# Altium PCB ActuatorMKII.PcbDoc (part 3 of 3)
Units mil, origin at the board's own origin, x right, y up, seen from the top; angles counter-clockwise.
Board outline 7000 x 5000 mil, 4 copper layers (Top Layer, Middle 1 Layer, Middle 2 Layer, Bottom Layer), stack 53.912 mil thick; 139 components, 107 nets, 485 pads, 302 vias.
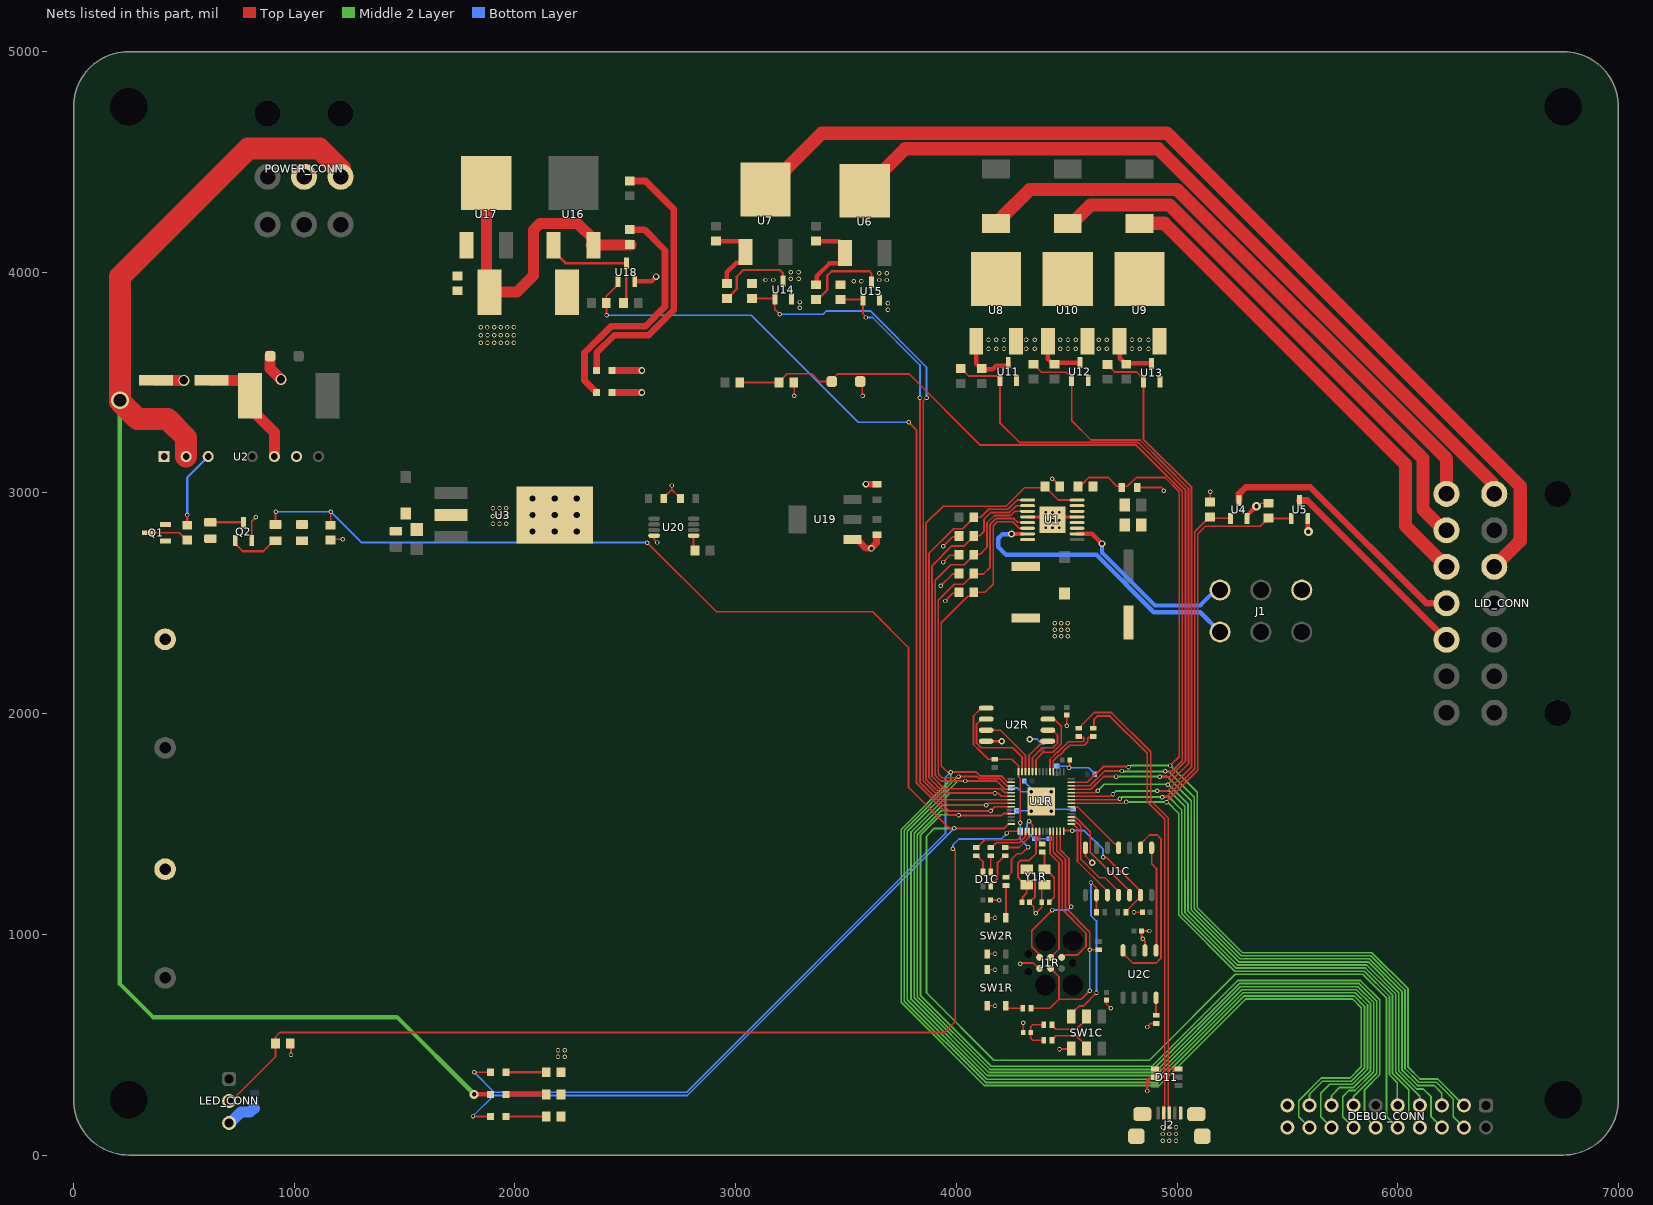
[diagram p4: the nets of this part, all layers, seen from the top]

## Via types
v1: diameter 20, hole 12, Top Layer to Bottom Layer, tented both sides, 244 vias
v2: diameter 50, hole 28, Top Layer to Bottom Layer, tented both sides, 22 vias
v3: diameter 30, hole 18, Top Layer to Bottom Layer, tented both sides, 13 vias
v4: diameter 30, hole 16, Top Layer to Bottom Layer, tented both sides, 10 vias
v5: diameter 40, hole 25, Top Layer to Bottom Layer, tented both sides, 4 vias
v6: diameter 40, hole 20, Top Layer to Bottom Layer, tented both sides, 3 vias
v7: diameter 50, hole 38, Top Layer to Bottom Layer, tented both sides, 3 vias
v8: diameter 40, hole 28, Top Layer to Bottom Layer, tented both sides, 2 vias
v9: diameter 80, hole 58, Top Layer to Bottom Layer, tented both sides, 1 vias

## Nets (pads, with @x,y where several pads share a name; then routed paths per layer and width w, separated by ;. In a path a pad name is that pad's centre, name@x,y a point inside that pad or via, vN(x,y) a via of type N, cw(c..) or ccw(c..) an arc to the next point about the centre after c; other vN are vias at no path point) (continued)
CANRX_RP2CAN: U1C.2 U2C.4 | length 886.3
  Top Layer w8: U2C.4@4755,927.28 4755,914.78 4799.78,870 4905,870 4926.81,891.81 4926.81,1433.19 4910,1450 4875,1450 4835,1410 U1C.2@4835,1392.28
CANTX_RP2CAN: U1C.1 U2C.1 | length 474.9
  Top Layer w8: U1C.1@4885,1392.28 4885,1320 4907,1298 4907,929.28 U2C.1@4905,927.28
COIL_1: D5.1 LID_CONN.8 U8.3 | length 2779.8
  Top Layer w60: D5.1@4180,4222 4200,4222 4213,4235 4213,4255 4333,4375 5000,4375 6221.06,3153.94 LID_CONN.8@6221.06,2996.06
COIL_2: D6.1 LID_CONN.9 U10.3 | length 2495.8
  Top Layer w60: D6.1@4505,4222 4518,4235 4538,4235 4608,4305 4965,4305 6115,3155 6115,2925 6209.29,2830.71 LID_CONN.9@6221.06,2830.71
COIL_3: D7.1 LID_CONN.10 U9.3 | length 2199
  Top Layer w60: D7.1@4830,4222 4830.14,4221.86 4943.14,4221.86 6035,3130 6035,2851.42 6220,2666.42 LID_CONN.10@6220,2665
DBG_TX_RP2040: J1R.5 U1R.27 | length 721.1
  Top Layer w8: J1R.5@4377.13,895.5 4372.73,899.9 4372.73,912.27 4341.63,943.37 4341.63,1016.63 v1(4435,1110) ; U1R.27@4471.11,1466.79 4471.11,1382.79 4510,1343.91 4510,1135.69 4520,1125.69 v1(4520,1125)
  Bottom Layer w8: v1(4435,1110) 4503.89,1110 4518.89,1125 v1(4520,1125)
DRAIN: DEBUG_CONN.12 R29.2 U1R.11 U18.1 | length 7861.7
  Top Layer w8: v1(2415,3805) 2415,3858.5 R29.2@2413.5,3860 2413.5,3891 2467.5,3945 U18.1@2467.5,3959 ; v1(3785,3320) 3820,3285 3820,1685.2 3963.7,1541.5 4008.5,1541.5 4011.5,1538.5 4205.28,1538.5 4213.79,1547.01 U1R.11@4249.17,1547.01
  Middle 2 Layer w8: v1(4010,1540) 4008,1542 3929.47,1542 3837,1449.53 3837,723.4 4158.4,402 4886.6,402 5275.6,791 5830.81,791 5919,702.81 5919,365.05 5850,296.05 5850,175 DEBUG_CONN.12@5895,130
  Bottom Layer w8: v1(2415,3805) 3070,3805 3555,3320 v1(3785,3320)
DROPPER_1: LID_CONN.11 U4.3 | length 1201
  Top Layer w30: U4.3@5280,2965.73 5281,2966.73 5281,2996 5311,3026 5604,3026 6130,2500 LID_CONN.11@6221.06,2500
DROPPER_2: LID_CONN.12 U5.3 | length 927.6
  Top Layer w30: U5.3@5555,2966 5589.71,2966 LID_CONN.12@6221.06,2334.65
GND: C1.2 C1C.2 C1R.2 C2C.1 C2R.2 C3.2 C3C.2 C3R.2 C4.2 C4C.2 C4R.2 C5.2 C5C.2 C5R.2 C6R.2 C7.2 C7R.2 C8.2 C8R.2 C9.2 C9R.2 C10.2 C10R.2 C11.2 C11R.2 C12.2 C12R.2 C13.2 C13R.2 C14.2 C15.2 D1.1 D8.2 D9.1 D10.2 D11.2 DEBUG_CONN.19 DEBUG_CONN.20 J1.6 J1R.6 J2.5 J2.6 J2.7 J2.8 J2.9 LED_CONN.3 POWER_CONN.2 Q2.2 R6.1 R6C.2 R7.2 R8.2 R9.2 R10.2 R21.2 R22.2 R23.2 R31.1 R32.1 R33.1 R34.1 R35.1 R36.1 R37.1 R38.1 R39.1 R40.1 R41.1 SW1C.6 SW1R.B1 SW1R.B2 SW2R.B1 SW2R.B2 U1.4 U1.13 U1.17 U1C.7 U1R.19 U1R.57 U2.1 U2.7 U2C.2 U2R.4 U3.2 U3.4 U4.2 U5.2 U8.2 U9.2 U10.2 U11.2 U12.2 U13.2 U14.2 U15.2 U18.2 U19.1 U20.4 Y1R.2 Y1R.4 | length 4677.7
  Top Layer w8: Q2.2@807.5,2784 807.5,2872.5 v1@825,2890 ; R41.1@982,505 985,502 v1(985,455) ; R38.1@1165,2786.5 1168.5,2790 v1(1220,2790) ; U20.4@2630.43,2806.61 2630,2806.18 2630,2790 v1@2645,2775 ; C14.2@2675,2960 C14.2@2675,2965 ; C14.2@2675,2975 2675,2980 2710,3015 ; v1(2710,3034) 2710,3015 ; C15.2@2744,2978.3 2744,2986 2739,2991 2734,2991 2710,3015 ; R22.2@3263.5,3500 3265,3498.5 v1(3265,3440) ; D9.1@3564.37,3505 3573.62,3495.75 3573.62,3441.38 v1(3575,3440) ; v1(3930,2579) 3930,2580 3982.5,2632.5 4009,2632.5 R35.1@4011.5,2635 ; v1(3940.65,2686.89) 3971.26,2717.5 4009,2717.5 R33.1@4011.5,2720 ; v1@3944.79,2760.21 3944.79,2762.67 3984.19,2802.07 4008.57,2802.07 R39.1@4011.5,2805 ; v1@3950,2510 3950,2511.2 3984.19,2545.39 4006.89,2545.39 R34.1@4011.5,2550 ; SW1R.B1@4135,835.71 SW1R.B1@4137.68,838.39 ; SW1R.B2@4140,676.61 SW1R.B2@4141.61,675 ; SW1R.B1@4140,840 v1(4175,840) ; SW2R.B2@4140,911.61 v1(4175,911.61) ; SW2R.B1@4140,1075 v1@4180,1075 ; SW1R.B2@4141.61,676.61 v1(4175,676.61) ; v1(4289.13,866.73) 4292.9,870.5 4347.16,870.5 4372.16,845.5 J1R.6@4377.13,845.5 ; v1@4300,600 v1@4301.44,598.56 ; C2C.1@4301.44,556.44 C2C.1@4302.87,555 ; C2C.1@4302.87,556.44 v1@4302.87,598.56 ; Y1R.4@4319.11,1295 4325.01,1295 4356.67,1263.35 4356.67,1171.22 4331.23,1145.79 C1R.2@4331.23,1145 4331.23,1144.21 4351.07,1124.37 4351.07,1103.04 v1(4359.11,1095) 4386.98,1122.87 C2R.2@4386.98,1145 4386.98,1212.87 Y1R.2@4399.11,1225 ; v1(4330.92,1513.23) 4330.92,1510.55 4345.13,1496.33 U1R.19@4345.13,1466.79 ; U1R.57@4357.87,1602.13 U1R.57@4384.5,1602.13 U1R.57@4407.33,1579.3 ; v1(4435,3065) 4436,3065 4468.5,3032.5 R40.1@4468.5,3030 ; v1(4467.42,480) 4518.94,480 SW1C.6@4521.1,482.17 ; v1(4500,1945) C3R.2@4500,1990.88 ; v1(4510.8,1755) 4512.45,1756.65 4512.45,1788.35 C4R.2@4514.11,1790 ; U1C.7@4585,1392.28 4585,1355 v4(4615,1325) ; C3C.2@4680,702.87 4680.46,702.41 4680.46,684.54 v1(4700,665) ; v1(4805,1100) C1C.2@4842.87,1100 ; C3.2@4820,3025 4930.51,3025 4937.7,3017.81 4937.7,3012.3 v1(4940,3010) ; C4C.2@4839.25,1015 4839.25,985.75 4855,970 U2C.2@4855,927.28 ; C4C.2@4840,1015 v1(4875,1015) ; v1(4865,580) 4881.3,596.3 R6C.2@4905,596.3 ; R31.1@5150,2958.5 v1(5150,3005) ; v6(5360,2940) 5367,2940 5380.5,2953.5 R32.1@5415,2953.5
  Top Layer w10: U2R.4@4135.24,1875.14 4135.3,1875.07 4204.93,1875.07 v4(4205,1875) ; C5C.2@4154.83,1155 v1(4195,1155)
  Top Layer w12: v1(4865,290) 4865,335 4876.59,346.59 4894.19,346.59 D11.2@4900,352.4
  Top Layer w14: U1.4@4322.8,2891.3 4388.74,2891.3 4402.94,2905.5 4404.5,2905.5 U1.17@4405,2905
  Top Layer w15: U1.17@4465,2905 4465.5,2905.5 4467.06,2905.5 4481.26,2891.3 U1.13@4547.2,2891.3
  Top Layer w20: U18.2@2542.5,3959 2619,3959 v3(2640,3980) ; U4.2@5317.5,2884 5317.5,2898 5359.5,2940 v6(5360,2940) ; U5.2@5592.5,2884 5592.5,2827.5 v6(5595,2825)
  Top Layer w30: D10.2@2440,3455 v3(2575,3455) ; D8.2@2440,3555 v3(2575,3555) ; U19.1@3530,2789.45 3534.69,2784.76 3555.35,2784.76 3591.12,2749 v3(3615,2749) ; v3(3590,3040) C12.2@3640,3040 ; v3@3615,2750 3638.18,2773.18 3638.18,2810 C13.2@3640,2810
  Top Layer w50: C7.2@374,3510 v7@490,3510 ; D1.1@890.63,3620 890.63,3564.37 v7(940,3515)
  Bottom Layer w8: C7R.2@4245,1662.87 4277.13,1662.87 4293.37,1646.63 v4(4340,1646.63) 4335.79,1650.84 4335.79,1664.36 4314.9,1685.25 4314.9,1687.98 C13R.2@4307.87,1695 ; C6R.2@4272.13,1560 4335,1560 v4@4340,1555 ; v1(4330.92,1513.23) 4320,1502.31 4320,1465.15 4339.05,1446.1 4345.25,1439.9 4347.98,1439.9 C8R.2@4355,1432.87 C12R.2@4420,1432.87 ; v4@4335,1885 4365.31,1885 4378.19,1872.13 C5R.2@4390,1872.13 ; v4(4429,1557.63) 4434.95,1557.63 4444.45,1567.13 C9R.2@4530,1567.13 ; C11R.2@4455,1762.13 4500.43,1762.13 4507.55,1755 4599.85,1755 4620.1,1734.75 4620.1,1732.02 C10R.2@4627.13,1725
  Bottom Layer w50: LED_CONN.3@705,145 708.73,145 758.73,195 800,195 815,210 C1.2@820,210
  other v1: 4935.36,65.36 4965.36,65.36 4995.36,65.36 4935.36,95.36 4965.36,95.36 4995.36,95.36 4935.36,125.36 4965.36,125.36 4995.36,125.36 2195,445 2225,445 2195,475 2225,475 4302.87,600 4845,980 4175,1075 4445.36,2350.36 4475.36,2350.36 4505.36,2350.36 4445.36,2380.36 4475.36,2380.36 4505.36,2380.36 4445.36,2410.36 4475.36,2410.36 4505.36,2410.36 3949.21,2510.41 3940.87,2758.75 2645.36,2775.36 4405.81,2842.12 4435.81,2842.12 4465.81,2842.12 1900.36,2860.36 1930,2860 1960,2860 4405.81,2877.12 4435.81,2877.12 4465.81,2877.12 825.36,2890.36 1900,2895 1930,2895 1960,2895 4405.81,2912.12 4435.46,2911.77 4465.81,2912.12 1900.36,2930.36 1930,2930 1960,2930 4145.87,3653.75 4180.87,3653.75 4215.87,3653.75 4315.87,3653.75 4355.87,3653.75 4470.87,3653.75 4505.87,3653.75 4540.87,3653.75 4645.87,3653.75 4680.87,3653.75 4795.87,3653.75 4830.87,3653.75 4870.87,3653.75 1845.36,3680.36 1875.36,3680.36 1905.36,3680.36 1935.36,3680.36 1965.36,3680.36 1995.36,3680.36 4145.87,3693.75 4180.87,3693.75 4215.87,3693.75 4315.87,3693.75 4355.87,3693.75 4470.87,3693.75 4505.87,3693.75 4540.87,3693.75 4645.87,3693.75 4680.87,3693.75 4795.87,3693.75 4830.87,3693.75 4870.87,3693.75 1845.36,3715.36 1875.36,3715.36 1905.36,3715.36 1935.36,3715.36 1965.36,3715.36 1995.36,3715.36 1845.36,3750.36 1875,3750 1905.36,3750.36 1935.36,3750.36 1965,3750 1995.36,3750.36 3690,3830 3290,3840 3690,3860 3290,3865 3535,3960 3570,3960 3135,3965 3170,3965 3650,3965 3685,3965 3250,3970 3285,3970 3650,3995 3685,3995 3250,4000 3285,4000
  other v2: 2080,2825 2180,2825 2280,2825 2080,2900 2180,2900 2280,2900 2080,2975 2180,2975 2280,2975
  other v4: 4340,1557.63 4429,1646.63 4331.83,1883.54
  other v7: 500,3510
INT_RP2CAN: U1C.4 U1R.34 | length 298.2
  Top Layer w8: U1R.34@4519.83,1578.5 4548.78,1578.5 4717.8,1409.49 4727.78,1409.49 4735,1402.27 U1C.4@4735,1392.28
LEDB_RP2CAN: R8C.1 U1R.18 | length 153.7
  Top Layer w8: R8C.1@4222.02,1393.7 4283.7,1393.7 4329.38,1439.38 U1R.18@4329.38,1466.79
LEDG_RP2CAN: R7C.1 U1R.17 | length 201.5
  Top Layer w8: R7C.1@4156.01,1393.7 4159.95,1393.7 4181.25,1415 4285,1415 4313.63,1443.63 U1R.17@4313.63,1466.79
LEDR_RP2CAN: R5C.1 U1R.16 | length 248.3
  Top Layer w8: R5C.1@4090,1393.7 4093.94,1393.7 4129.24,1429 4277.34,1429 4296.07,1447.73 4297.89,1449.57 U1R.16@4297.89,1466.79
LVL_SHIFT_EN: R30.2 U20.5 | length 79.5
  Top Layer w10: U20.5@2809.57,2806.61 2809.57,2736.93 R30.2@2816.5,2730
MARKER_1: DEBUG_CONN.8 R31.2 U1R.36 U4.1 | length 4217.6
  Top Layer w8: U1R.36@4533.06,1610 4731.75,1610 4736.75,1615 v1(4740,1615) v1@4740,1620 ; v1(4933.25,1621.75) 4951.75,1621.75 5080,1750 5080,2824 5147.5,2891.5 R31.2@5150,2891.5 5156.5,2885 U4.1@5244.85,2885
  Middle 2 Layer w8: v1(4740,1615) 4743.25,1615 4749.99,1621.75 v1(4933.25,1621.75) 4935,1620 4935,1620.25 4938.8,1624.04 4939.04,1624.04 4940,1625 4960,1625 5021.43,1563.57 5021.43,1093.37 5267.8,847 5854.01,847 5976.89,724.12 5976.89,369.12 6050,296.01 6050,185 6095,140 DEBUG_CONN.8@6095,130
MARKER_2: DEBUG_CONN.9 R32.2 U1R.35 U5.1 | length 4312.3
  Top Layer w8: U1R.35@4519.83,1594.25 4761,1594.25 4766.75,1600 v1(4770,1600) ; v1@4955,1605 5094,1744 5094,2814 5129,2849 5377.5,2849 R32.2@5415,2886.5 5417.5,2884 U5.1@5517.5,2884
  Middle 2 Layer w8: v1(4770,1600) 4955,1600 5007.43,1547.57 5007.43,1087.57 5262,833 5848.21,833 5962.89,718.32 5962.89,363.32 5998.12,328.09 DEBUG_CONN.9@5998.12,221.88
  other v1: 4952.2,1598.49
MISO_RP2CAN: U1C.12 U1R.31 | length 475.9
  Top Layer w8: U1R.31@4519.83,1531.26 4519.9,1531.2 4541.29,1531.2 4606.81,1465.67 4606.81,1372.64 4785,1194.45 U1C.12@4785,1177.72
MOSI_RP2CAN: U1C.11 U1R.30 | length 451.6
  Top Layer w8: U1R.30@4519.83,1515.51 4519.9,1515.45 4537.24,1515.45 4563.19,1489.5 4563.19,1341.46 4648.6,1256.04 4673.41,1256.04 4735,1194.45 U1C.11@4735,1177.72
MOTOR_A: J1.1 U1.7 | length 1321.7
  Top Layer w20: v3(4250,2813.81) 4250.36,2814.17 U1.7@4299.33,2814.17
  Bottom Layer w20: v3(4250,2813.81) 4208.81,2813.81 4190,2795 4190,2755 4225,2720 4635,2720 4895,2460 5104.96,2460 J1.1@5194.96,2370
MOTOR_B: J1.4 U1.10 | length 843.2
  Top Layer w20: U1.10@4547.2,2814.52 4615.48,2814.52 v3(4660,2770)
  Bottom Layer w20: v3(4660,2770) 4660,2730 4900,2490 5104.39,2490 J1.4@5195,2580.61
MOTOR_EN: D3.1 DEBUG_CONN.18 R34.2 U1.6 U1R.2 | length 9067.8
  Top Layer w8: v1(1815,375) D3.1@1890,375 ; v1(3975,1735) 3974.94,1735.06 3959.94,1735.06 3932,1763 3932,2412 4051.5,2531.5 4062.5,2531.5 4078.5,2547.5 R34.2@4078.5,2550 4130,2550 4167,2587 4167,2852 4185,2870 4255,2870 4284.89,2840.11 U1.6@4322.8,2840.11 ; v1@3975.3,1735.3 4089.7,1735.3 4107,1718 4202.66,1718 4231.85,1688.8 U1R.2@4235.94,1688.8
  Middle 2 Layer w8: v1(3975,1735) 3975,1700 3750,1475 3750,691.61 4126.61,315 4918.64,315 5310.64,707 5796.02,707 5835,668.02 5835,399.85 5784.45,349.3 5654.3,349.3 5551.11,246.11 5551.11,173.89 DEBUG_CONN.18@5600,125
  Bottom Layer w8: v1(1815,375) 1905,285 2778.74,285 3951,1457.26 3951,1711 v1(3975,1735)
MOTOR_FAULT: DEBUG_CONN.15 R25.2 U1.1 U1R.6 | length 6157.3
  Top Layer w8: U1R.6@4249.17,1625.75 4204.25,1625.75 4190.06,1639.94 4175.06,1639.94 v1(4175,1640) 3945.2,1640 3876,1709.2 3876,2726.14 3987.36,2837.5 4028.5,2837.5 4078.5,2887.5 R25.2@4078.5,2890 4110,2890 4146,2926 4233.63,2926 4275.69,2968.07 U1.1@4322.8,2968.07
  Middle 2 Layer w8: v1(4175,1640) 3971.4,1640 3795,1463.6 3795,841.01 3795,706.01 4141.01,360 4903.99,360 5292.99,749 5813.41,749 5877,685.41 5877,382.45 5800.84,306.3 5737.67,306.3 5700,268.63 DEBUG_CONN.15@5700,235
MOTOR_MODE1: R39.2 U1.2 U1R.5 | length 1910.7
  Top Layer w8: U1R.5@4235.94,1641.56 4232.64,1641.56 4230.89,1643.31 4217.95,1643.31 4201.26,1660 3945,1660 3890,1715 3890,2670 3980,2760 4036,2760 4078.5,2802.5 R39.2@4078.5,2805 4079.31,2805.81 4105.81,2805.81 4125,2825 4125,2880 4157,2912 4240.84,2912 4271.32,2942.48 U1.2@4322.8,2942.48
MOTOR_MODE2: R40.2 U1.16 U1R.7 | length 2360
  Top Layer w8: U1R.7@4249.17,1610 4249.1,1610.06 3955.34,1610.06 3862,1703.4 3862,2862.15 3939.85,2940 4225,2940 4309,3024 4405,3024 4416.5,3012.5 4417.5,3012.5 4461.93,2968.07 U1.16@4547.2,2968.07
MOTOR_PHASE: DEBUG_CONN.16 R33.2 U1.3 U1R.4 | length 6117.6
  Top Layer w8: U1R.4@4235.94,1657.31 4220.22,1657.31 4182.52,1695 v1(4040,1695) 3930,1695 3904,1721 3904,2604 3975,2675 4036,2675 4078.5,2717.5 R33.2@4078.5,2720 4078.5,2722.5 4107.5,2722.5 4139,2754 4139,2864 4173,2898 4246.64,2898 4265.53,2916.89 U1.3@4322.8,2916.89
  Middle 2 Layer w8: v1(4040,1695) 4006.6,1695 3778,1466.4 3778,703.21 4138.21,343 4907.04,343 5299.04,735 5807.61,735 5863,679.61 5863,388.25 5795.05,320.3 5691.67,320.3 5651.11,279.74 5651.11,173.89 5695,130 DEBUG_CONN.16@5700,130
MOTOR_SLEEP: DEBUG_CONN.17 R35.2 U1.5 U1R.3 | length 5977.9
  Top Layer w8: v1(4010,1715) v1@4010,1710 ; U1R.3@4235.94,1673.06 4227.8,1673.06 4194.36,1706.5 4102.24,1706.5 4093.74,1715 4015,1715 v1@4010,1710 ; U1.5@4322.8,2865.7 4321.69,2866.81 4278.19,2866.81 4261,2884 4179,2884 4153,2858 4153,2663 4122.97,2632.97 4080.53,2632.97 R35.2@4078.5,2635 4078.5,2632.5 4032.32,2586.32 3991.18,2586.32 3918,2513.14 3918,1727.2 3935.2,1710 v1@4010,1710
  Middle 2 Layer w8: v1(4010,1715) 4006.8,1715 3764,1472.2 3764,697.41 4132.41,329 4912.84,329 5304.84,721 5801.82,721 5849,673.82 5849,394.05 5789.25,334.3 5659.09,334.3 5600,275.2 DEBUG_CONN.17@5600,235
MOTOR_VPROPI: C3.1 DEBUG_CONN.3 R1.1 U1R.41 | length 4741.6
  Top Layer w8: U1R.41@4533.06,1688.8 4593.8,1688.8 4665,1760 4777.7,1760 v1(4780,1757.7) ; R1.1@4554.5,3027 4565,3037.5 4567.5,3037.5 4600,3070 4687.85,3070 4727.69,3030.16 4750,3030.16 4775.16,3030.16 4815,3070 4945.31,3070 5010,3005.31 5010,1805 v1(4970,1765)
  Middle 2 Layer w8: v1(4780,1757.7) 4783.25,1757.7 4790.54,1765 v1(4970,1765) 5092,1643 5092,1121.79 5296.79,917 5883,917 6046.89,753.11 6046.89,398.11 6100.7,344.3 6180.7,344.3 DEBUG_CONN.3@6300,225
nCS_RP2CAN: R4C.2 U1C.13 U1R.28 | length 603
  Top Layer w8: U1R.28@4486.86,1466.79 4486.86,1469.94 4486.93,1470 v1(4525,1470) ; v1(4665,1350) 4665.19,1349.81 4679.92,1349.81 4835,1194.72 U1C.13@4835,1185 ; R4C.2@4765,1105 4769.76,1105 4775.53,1110.76 4822.76,1158 4827.78,1158 4835,1165.21 U1C.13@4835,1177.72
  Bottom Layer w8: v1(4525,1470) 4580,1470 4665,1385 v1(4665,1350)
Net1_1: 1.1 C7.1 U2.6 | length 531.7
  Top Layer w50: C7.1@626,3510 754.5,3510 784.5,3480 1.1@784.5,3440 ; 1.1@799.5,3440 829.5,3410 829.5,3355.5 910,3275 U2.6@910,3165
NetC2_1: C2.1 U1.14
NetC2C_2: C2C.2 R2C.2 R3C.2 | length 179.1
  Top Layer w8: R3C.2@4396.3,520 4345,520 4337.13,527.87 C2C.2@4337.13,555 4337.13,582.13 4345,590 R2C.2@4396.3,590
NetC2R_1: C2R.1 R1R.2 Y1R.3 | length 265.2
  Top Layer w8: R1R.2@4389.11,1372.6 4392.28,1372.6 4399.11,1365.77 Y1R.3@4399.11,1295 4405.01,1295 4444.11,1255.91 4444.11,1168.66 4421.23,1145.79 C2R.1@4421.23,1145
NetC6_1: C6.1 U1.11
NetC6_2: C6.2 U1.12
NetD1C_1: D1C.1 R5C.2 | length 89.8
  Top Layer w8: R5C.2@4090,1356.3 4093.94,1356.3 4120.58,1329.66 D1C.1@4120.58,1281.5
NetD1C_2: D1C.2 R7C.2 | length 75.3
  Top Layer w8: D1C.2@4156.01,1281.01 R7C.2@4156.01,1356.3
NetD1C_3: D1C.3 R8C.2 | length 167.4
  Top Layer w8: D1C.3@4156.01,1218.5 4156.01,1223.43 4187.05,1254.46 4187.05,1325.26 4218.08,1356.3 R8C.2@4222.02,1356.3
NetD2_2: D2.2 R8.1 | length 181.5
  Top Layer w10: D2.2@1960,175 R8.1@2141.5,175
NetD3_2: D3.2 R9.1 | length 181.5
  Top Layer w10: D3.2@1960,375 R9.1@2141.5,375
NetD4_2: D4.2 R10.1 | length 178.2
  Top Layer w20: D4.2@1960,275 R10.1@2138.19,275
NetD8_1: D8.1 R18.1 | length 1219
  Top Layer w30: D8.1@2370,3555 2370,3635 2450,3715 2605,3715 2720,3830 2720,4285 2591.5,4413.5 R18.1@2520,4413.5
NetD10_1: D10.1 R24.1 | length 1108.5
  Top Layer w30: D10.1@2370,3455 2315,3510 2315,3635 2435,3755 2590,3755 2680,3845 2680,4100 2586.5,4193.5 R24.1@2520,4193.5
NetQ1_1: Q1.1 R2.2 R3.1
NetQ1_3: Q1.3 R4.1 | length 194.9
  Top Layer w8: Q1.3@334,2820 479,2820 512.5,2786.5 R4.1@515,2786.5
NetQ2_1: Q2.1 R5.2 | length 230.4
  Top Layer w10: Q2.1@732.5,2784 732.5,2770 766.85,2735.65 859.19,2735.65 906.73,2783.19 R5.2@915,2783.19
NetQ2_3: Q2.3 R3.2 | length 147.5
  Top Layer w10: R3.2@622.46,2867.46 Q2.3@770,2867.46
NetR1_2: R1.2 U1.15
NetR2C_1: R2C.1 SW1C.2 | length 197.8
  Top Layer w8: R2C.1@4433.7,590 4433.7,586.06 4449.76,570 4543.98,570 4590,616.02 SW1C.2@4590,627.83
NetR3C_1: R3C.1 SW1C.5 | length 197.8
  Top Layer w8: R3C.1@4433.7,520 4440.53,526.83 4440.53,530.76 4449.76,540 4543.98,540 4590,493.98 SW1C.5@4590,482.17
NetR4_2: R4.2 U2.3 | length 342.9
  Top Layer w10: R4.2@515,2855.56 v1@515,2896.65
  Bottom Layer w10: v1(515.36,2900.36) 515.36,3070.36 605,3160 U2.3@610,3160
NetR6_2: R6.2 U1.8
NetR6C_1: R6C.1 U2C.8 | length 79
  Top Layer w8: R6C.1@4905,633.7 U2C.8@4905,712.72
NetR6R_1: R6R.1 SW1R.A2 | length 85.9
  Top Layer w8: R6R.1@4301.3,665 4233.44,665 SW1R.A2@4224.65,673.8 ; SW1R.A2@4224.65,673.8 SW1R.A2@4224.65,676.61 SW1R.A2@4224.65,673.8
NetR7R_1: R7R.1 SW2R.A1 | length 146.3
  Top Layer w8: SW2R.A1@4225,1075 R7R.1@4225,1221.3
NetR11_2: R11.2 R16.1 U6.1 | length 394.7
  Top Layer w20: R16.1@3365,3943.5 3366.78,3945.28 3366.78,3981.78 3425,4040 3473.5,4040 3495,4061.5 3495,4115 3468.5,4141.5 R11.2@3365,4141.5
NetR12_2: R12.2 R17.1 U7.1 | length 362.3
  Top Layer w20: R12.2@2910,4141.5 3023.5,4141.5 3045,4120 U7.1@3045,4092.5 3045,4065 3023.5,4043.5 3003.5,4043.5 2960,4000 R17.1@2960,3948.5
NetR13_2: R13.2 U8.1 U11.3 | length 291.2
  Top Layer w20: U8.1@4090.04,3700 4090.04,3585.22 4101.76,3573.5 4102.5,3573.5 4116,3560 4165,3560 4181,3576 4234,3576 4235,3577 U11.3@4235,3591
NetR14_2: R14.2 U10.1 U12.3 | length 230
  Top Layer w20: U10.1@4415.04,3684 4415.04,3605.96 4431,3590 4559,3590 U12.3@4560,3591
NetR15_2: R15.2 U9.1 U13.3 | length 234.3
  Top Layer w20: U9.1@4740.04,3690 4740.04,3610.96 4762.5,3588.5 4882.5,3588.5 U13.3@4885,3586
NetR16_2: R16.2 U15.3 | length 390.1
  Top Layer w10: R16.2@3365,3880 3376.5,3891.5 3386.5,3891.5 3415,3920 3415,3985 3435,4005 3605,4005 3615,3995 U15.3@3615,3948.86
NetR17_2: R17.2 U14.3 | length 386.2
  Top Layer w10: R17.2@2960,3881.5 2962.5,3881.5 3005,3924 3005,3980 3035,4010 3200,4010 3214.86,3995.14 3214.86,3956.14 U14.3@3215,3956
NetR19_2: R19.2 U16.1 U18.3 | length 570.4
  Top Layer w12: U16.1@2175,4122.5 2175,4095 2229,4041 U18.3@2505,4041 2505,3873.5 R19.2@2491.5,3860
  Top Layer w30: U16.1@2167.54,4118.5 U16.1@2171.5,4118.5
NetR21_1: R21.1 R24.2 U16.2 U17.3 | length 1458.6
  Top Layer w50: U17.3@1870,4404.5 1870,3924.5 R21.1@1884.5,3910 2010,3910 2085,3985 2085,4192.21 2114.29,4221.5 2283.5,4221.5 2355,4150 U16.2@2355,4122.5 ; U16.2@2344.96,4123.5 R24.2@2525,4123.5
QSPI_SCLK_RP2040: U1R.52 U2R.6 | length 271
  Top Layer w8: U1R.52@4345.13,1737.46 4345.13,1800.13 4390,1845 4437.13,1845 4458.23,1866.1 4458.23,1903.19 U2R.6@4436.42,1925
QSPI_SD0_RP2040: U1R.53 U2R.5 | length 185.8
  Top Layer w8: U1R.53@4329.38,1737.46 4329.38,1811.27 4393.11,1875 4414.76,1875 U2R.5@4415,1875
QSPI_SD1_RP2040: U1R.55 U2R.2 | length 436.6
  Top Layer w8: U2R.2@4135,1975 4113.58,1975 4091.77,1953.19 4091.77,1866.1 4112.87,1845 4255,1845 4297.89,1802.11 U1R.55@4297.89,1737.46
QSPI_SD2_RP2040: U1R.54 U2R.3 | length 299.4
  Top Layer w8: U2R.3@4135.24,1925 4200,1925 4313.57,1811.43 U1R.54@4313.63,1737.46 U1R.54@4313.63,1737.46
QSPI_SD3_RP2040: U1R.51 U2R.7 | length 322.4
  Top Layer w8: U1R.51@4360.88,1737.46 4360.88,1790.88 4394.64,1824.64 4436.56,1824.64 4472.23,1860.3 4472.23,1860.97 4475,1863.74 4475,1943.49 U2R.7@4443.49,1975
QSPI_SS_RP2040: R5R.2 R7R.2 U1R.56 U2R.1 | length 1017.3
  Top Layer w8: U2R.1@4140.07,2025.07 4140,2025 4113.45,2025 4077.77,1989.32 4077.77,1860.3 4107.66,1830.42 4144.37,1793.7 R5R.2@4175,1793.7 4251.3,1793.7 4282.14,1762.86 U1R.56@4282.14,1737.46 ; R7R.2@4220.61,1259.35 R7R.2@4221.26,1258.7 ; R7R.2@4225,1255 4250,1280 4250,1340 4275,1365 4295,1365 v1(4325,1395) ; U1R.56@4282.14,1724.24 4282.14,1712.86 4290,1705 v1(4290,1505)
  Bottom Layer w8: v1(4290,1505) 4290,1430 v1(4325,1395)
RGB_DATA: LED_CONN.2 R41.2 U1R.15 | length 4621.1
  Top Layer w8: LED_CONN.2@705,245 714,245 915,446 915,490 R41.2@925,500 ; R41.2@915,505 915,535 935,555 3945,555 3995,605 3995,1376.75 3983.62,1388.13 v1(3983.13,1388.13) ; v1(4227.87,1459.01) 4228.54,1459.01 4236.33,1466.79 U1R.15@4282.14,1466.79
  Bottom Layer w8: v1(3983.13,1388.13) 3985,1390 3985,1405.2 4011.8,1432 4204.11,1432 4227.87,1455.76 v1(4227.87,1459.01)
RUN_RP2040: J1R.4 R4R.2 R6R.2 U1R.26 | length 1277.1
  Top Layer w8: R6R.2@4340,665 4424,665 4465,706 ; J1R.4@4427.13,845.5 4465,807.63 4465,706 ; U1R.26@4455.37,1466.79 4455.43,1466.73 4455.43,1378.68 4495,1339.11 4495,1120 4605,1010 v1(4605,930) R4R.2@4645,930 ; v1(4605,745) 4566,706 4465,706
  Bottom Layer w8: v1(4605,745) v1(4605,930)
SCK_RP2CAN: U1C.10 U1R.29 | length 398.2
  Top Layer w8: U1R.29@4519.83,1499.76 4533,1499.76 4535,1497.76 4535,1494.49 4549.19,1480.3 4549.19,1330.26 4685,1194.45 U1C.10@4685,1177.72
SWCLK_RP2040: J1R.3 U1R.24 | length 602.9
  Top Layer w8: U1R.24@4423.87,1466.79 4423.87,1366.13 4465,1325 4465,995 ; J1R.3@4427.13,895.5 4465,933.37 4465,993.93
SWDIO_RP2040: J1R.1 U1R.25 | length 713.8
  Top Layer w8: U1R.25@4439.62,1466.79 4439.62,1372.01 4480,1331.63 4480,1112.83 4587.63,1005.2 4587.63,945.44 4548.19,906 4493.31,906 4482.81,895.5 J1R.1@4477.13,895.5
TERM_DET_RP2CAN: R1C.2 SW1C.3 U1C.9 | length 820.9
  Top Layer w8: SW1C.3@4521.1,627.83 4521.1,639.65 4536.79,655.33 4536.85,655.33 4556.52,675 4575,675 v1(4635,735) ; v1(4610,1235) 4633.94,1211.06 4633.94,1178.78 U1C.9@4635,1177.72 R1C.2@4635,1100
  Bottom Layer w8: v1(4610,1235) 4610,1085 4635,1060 v1(4635,735)
TORP_ARM: D2.1 DEBUG_CONN.10 R5.1 R38.2 U1R.14 | length 11085.6
  Top Layer w8: R5.1@915,2856.81 v1@915,2915 ; R38.2@1165,2853.5 v1(1165,2915) ; v1@1810,175 D2.1@1890,175 ; v1(2600,2775) 2913,2462 3620.47,2462 3783,2299.47 3783,1665.74 3968,1480.74 3989.26,1480.74 v1(3990,1480) 4216.24,1480 U1R.14@4235.94,1499.7
  Middle 2 Layer w8: v1(3990,1480) 3900,1480 3865,1445 3865,735 4170,430 4875,430 5264,819 5842.41,819 5948.89,712.52 5948.89,176.11 DEBUG_CONN.10@5995,130
  Bottom Layer w8: v1(915.36,2915.36) 915.53,2915.18 v1@1165,2915.18 ; v1@1165,2920 v1@1165,2915.18 ; v1(1810,176.65) 1903.35,270 2780,270 v1(3990,1480) ; v1(2600,2775) 1305,2775 v1(1165,2915) v1@1165,2915.18
TORP_COIL1: DEBUG_CONN.5 R26.2 U1R.39 U11.1 | length 5593
  Top Layer w8: R26.2@4020,3563.5 4022.5,3563.5 4056,3530 4190.5,3530 4197.5,3523 4197.5,3317.5 4286.5,3228.5 4823.67,3228.5 4929.62,3122.56 5038,3014.17 5038,1784.74 4966.75,1713.49 4926.51,1713.49 v1@4925,1715 ; U1R.39@4519.83,1657.24 4609.36,1657.24 4667.12,1715 v1(4724.28,1715) ; v1@4725.9,1716.62 v1@4729.82,1712.7
  Middle 2 Layer w8: v1(4724.28,1715) 4955,1715 5064,1606 5064,1110.2 5285.2,889 5871.4,889 6018.89,741.51 6018.89,386.51 6090.11,315.3 6164.67,315.3 6200,279.97 6200,235 DEBUG_CONN.5@6205,230
  other v1: 4922.2,1713.49
TORP_COIL2: DEBUG_CONN.6 R27.2 U1R.38 U12.1 | length 5302.3
  Top Layer w8: R27.2@4350,3583.5 4386,3547.5 4498,3547.5 4522.5,3523 U12.1@4522.5,3509 4522.5,3327.5 4610,3240 4831.97,3240 4939.52,3132.46 5052,3019.97 5052,1773.29 4958.71,1680 v1@4955,1680 ; U1R.38@4533.06,1641.5 4628.25,1641.5 4636.75,1650 v1(4640,1650)
  Middle 2 Layer w8: v1(4640,1650) 4670,1680 4960,1680 5050,1590 5050,1104.4 5279.4,875 5865.6,875 6004.89,735.71 6004.89,380.71 6086.31,299.3 6115.67,299.3 6151.11,263.86 6151.11,173.89 6195,130 DEBUG_CONN.6@6195,125
  other v1: 4957.2,1678.49
TORP_COIL3: DEBUG_CONN.7 R28.2 U1R.37 U13.1 | length 4919.1
  Top Layer w8: U1R.37@4533.06,1625.75 4697.5,1625.75 4706.75,1635 v1(4710,1635) ; R28.2@4685,3580 4689.5,3580 4702.5,3567 4702.5,3562.5 4717,3548 4817.5,3548 4847.5,3518 U13.1@4847.5,3504 4847.5,3244.27 5066,3025.77 5066,3001 5066,1759 4957,1650 v1(4910,1650)
  Middle 2 Layer w8: v1(4710,1635) 4725,1650 v1(4910,1650) 4965,1650 5035.43,1579.57 5035.43,1244.17 5036,1243.6 5036,1098.6 5273.6,861 5859.8,861 5990.89,729.91 5990.89,374.91 6100,265.8 6100,235 DEBUG_CONN.7@6105,230
TORP_SEL1: DEBUG_CONN.13 R36.2 U1R.9 U15.1 | length 6944.9
  Top Layer w8: R36.2@3475,3876.5 3557.86,3876.5 3559.19,3877.83 3570.5,3877.83 3573.05,3880.38 3573.05,3881.95 3582.78,3872.22 U15.1@3582.78,3854.72 ; U15.1@3575,3865 3577.5,3862.5 3577.5,3810.75 3590,3798.25 v1(3590,3795) ; v1(3835,3431) 3835,1690 3965,1560 v1(4155,1560) 4173.5,1578.5 U1R.9@4249.17,1578.5
  Middle 2 Layer w8: v1(4155,1560) 3930.99,1560 3823,1452.01 3823,717.6 4152.6,388 4892.4,388 5281.4,777 5825.01,777 5905,697.01 5905,370.85 5800,265.85 5800,235 DEBUG_CONN.13@5805,230
  Bottom Layer w8: v1(3590,3795) 3620,3795 3835,3580 v1(3835,3431)
TORP_SEL2: DEBUG_CONN.14 R37.2 U1R.8 U14.1 | length 7505.5
  Top Layer w8: R37.2@3089.99,3866.51 R37.2@3075,3881.5 3175,3881.5 U14.1@3177.5,3879 3177.5,3832.5 v1(3200,3810) ; v1(3865,3431.72) 3850,3416.72 3850,1695.6 3960.6,1585 4138.25,1585 4147.5,1594.25 U1R.8@4249.17,1594.25
  Middle 2 Layer w8: v1(4135,1585) 3936.2,1585 3809,1457.8 3809,711.8 4146.8,374 4898.2,374 5287.2,763 5819.21,763 5891,691.21 5891,376.65 5806.64,292.3 5778.67,292.3 5751.11,264.74 5751.11,173.89 5795,130 DEBUG_CONN.14@5800,130
  Bottom Layer w8: v1(3200,3810) 3396.62,3810 3411.62,3825 3610,3825 3865,3570 v1(3865,3431.72)
TORPEDO_1: LID_CONN.1 U6.3 | length 3608.2
  Top Layer w60: U6.3@3585,4369.5 3585,4377.5 3767.5,4560 4915,4560 6426.48,3048.52 6426.48,3007.18 LID_CONN.1@6437.6,2996.06
TORPEDO_2: LID_CONN.3 U7.3 | length 4608.8
  Top Layer w60: U7.3@3135,4374.5 3135,4382.5 3219,4466.5 3227,4466.5 3390.5,4630 4955,4630 6555,3030 6555,2782.76 6445,2672.76 LID_CONN.3@6445,2660
USB_N: D11.1 J2.2 R3R.1 | length 2068.7
  Top Layer w8: R3R.1@4620,1933.7 4624,1937.7 4624,1974 4639,1989 4696,1989 4865,1820 4865,1600 4944.2,1520.8 4944.2,389.8 ; D11.1@4900,389.8 4944.2,389.8 ; J2.2@4939.41,190.32 4943.28,194.19 4943.28,223.54 4944.2,224.47 4944.2,250.29 4944.6,250.68 4944.6,390 4944.4,389.8 4944.2,389.8
USB_P: D11.6 J2.3 R2R.1 | length 2149.3
  Top Layer w8: R2R.1@4553.99,1933.7 4557.93,1933.7 4564.75,1940.53 4564.75,1944.46 4625.29,2005 4702.63,2005 4881,1826.63 4881,1606.63 4960.2,1527.42 4960.2,389.8 4960.2,224.47 4961.13,223.54 4961.13,194.19 J2.3@4965,190.32 ; 4960.8,389.8 D11.6@5006.3,389.8
USB_RP2040_N: R3R.2 U1R.46 | length 271.3
  Top Layer w8: U1R.46@4439.56,1750.68 4439.18,1751.06 4439.18,1786.3 4464.69,1811.81 4467.83,1811.81 4501.16,1845.14 4502.77,1845.14 4514.71,1857.09 4579.97,1857.09 4594.99,1872.12 4594.99,1887.71 4599.68,1892.4 4616.1,1892.4 R3R.2@4620,1896.3
USB_RP2040_P: R2R.2 U1R.47 | length 283.1
  Top Layer w8: U1R.47@4423.87,1737.46 4423.87,1750.62 4424.31,1751.06 4424.31,1792.45 4458.53,1826.67 4461.67,1826.67 4508.09,1873.09 4573.34,1873.09 4578.99,1878.74 4578.99,1887.71 4574.31,1892.4 4557.89,1892.4 R2R.2@4553.99,1896.3
V+: D4.1 POWER_CONN.3 Q1.2 R2.1 R23.1 U2.2 U17.1 | length 6862.4
  Top Layer w20: v6(1815,275) D4.1@1890,275
  Top Layer w100: U2.2@510,3165 510,3250 425,3335 290,3335 210,3415 210,3980 790,4560 1115,4560 1206.53,4468.47 1206.53,4436.06 POWER_CONN.3@1210,4432.6
  Middle 2 Layer w20: v9(210,3420) 210,775 360,625 1465,625 v6(1815,275)
V_DIV: D9.2 DEBUG_CONN.4 R20.2 R22.1 U1R.40 | length 6611.8
  Top Layer w8: R20.2@3020,3500 R22.1@3195,3500 ; R22.1@3196.5,3500 R22.1@3195,3500 ; D9.2@3430,3515 3437.36,3515 3461.38,3539.02 3785.98,3539.02 4108,3217 4815.37,3217 4919.72,3112.66 5024,3008.38 5024,1787 4975.48,1738.49 4956.51,1738.49 v1@4955,1740 ; D9.2@3435.63,3505 3380,3505 3345,3540 3234,3540 3195,3501 R22.1@3195,3500 ; U1R.40@4519.83,1672.99 4605.32,1673 4672.32,1740 v1(4750,1740)
  Middle 2 Layer w8: v1(4750,1740) 4752.3,1737.7 4962.3,1737.7 5078,1622 5078,1115.99 5290.99,903 5877.2,903 6032.89,747.31 6032.89,392.31 6095.91,329.3 6175.91,329.3 6251.11,254.09 6251.11,173.89 DEBUG_CONN.4@6300,125
  other v1: 4947.2,1738.49
XIN_RP2040: C1R.1 U1R.20 Y1R.1 | length 406.7
  Top Layer w8: C1R.1@4296.98,1145 4300.29,1148.31 4300.29,1168.81 4319.11,1187.63 Y1R.1@4319.11,1225 4313.2,1225 4279.11,1259.09 4279.11,1321.46 4292.65,1335 4330,1335 4360.88,1365.88 U1R.20@4360.88,1466.79
XOUT_RP2040: R1R.1 U1R.21 | length 64.3
  Top Layer w8: U1R.21@4376.63,1466.79 4376.63,1422.48 4378.34,1420.76 4378.34,1416.83 4385.17,1410 R1R.1@4389.11,1410
pads on no net: D11.3 D11.4 J1R.A J1R.B J1R.C J1R.D J1R.E J1R.F J1R.G J2.1 J2.4 LID_CONN. LID_CONN.2 POWER_CONN. SW1R.A1 SW2R.A2 U1C.3 U1C.5 U1C.8 U2.5 U2.8

## Polygon pours and split planes (outlines as drawn)
GND on Top Layer "GND_L01_P052" (solid, pour order 52): 1425,2800 1410,2815 1410,2930 1435,2955 1965,2955 1985,2935 1985,2850 1970,2835 1625,2835 1590,2800
+15V on Top Layer "+15V_L01_P053" (solid, pour order 53): 1575.82,3045 1631.32,2970.48 1780,2970 1800,2990 1800,3055 1550,3305 1550,3980 1245,4285 1170,4285 1140,4255 1140,4180 1420,3900 1420,3045
V+ on Top Layer "V+_L01_P035" (solid, pour order 35): 385,2852 385,3020 460,3095 460,3210 480,3230 545,3230 560,3215 560,3095 625,3030 1030,3030 1095,2965 1095,2860 1070,2835 975,2835 955,2855 955,2915 935,2935 475,2935 448.85,2908.85 448.85,2852 442.49,2846.49 390.51,2846.49
+24V on Top Layer "NONET_L-01_P-001" (solid, pour order 64): 3115,4045 3130,4030 3255,4030 3265,4040 3265,4175 3255,4185 3125,4185 3115,4175
GND on Top Layer "GND_L01_P062" (solid, pour order 62): 3045,3915 3030,3930 3030,3980 3045,3995 3185,3995 3200,3980 3200,3930 3185,3915
+24V on Top Layer "NONET_L-01_P-001" (solid, pour order 60): 3565,4040 3580,4025 3705,4025 3715,4035 3715,4170 3705,4180 3575,4180 3565,4170
GND on Top Layer "GND_L01_P046" (solid, pour order 46): 3630,4000 3645,4015 3690,4015 3705,4000 3705,3820 3690,3805 3645,3805 3630,3820
GND on Top Layer "GND_L01_P047" (solid, pour order 47): 3445,3910 3430,3925 3430,3975 3445,3990 3585,3990 3600,3975 3600,3925 3585,3910
GND on Top Layer "GND_L01_P043" (solid, pour order 43): 4650,3470 4650,3620 4865,3620 4865,3470 5000,3470 5000,3790 4960,3830 4020,3830 3970,3780 3970,3625 4215,3625 4215,3470 4310,3470 4310,3625 4540,3625 4540,3470
GND on Top Layer "GND_L01_P039" (solid, pour order 39): 2185,130 2175,140 2175,480 2185,490 2235,490 2245,480 2245,140 2235,130
V+ on Top Layer "V+_L01_P030" (solid, pour order 30): 1375,4610 1330,4610 1080,4610 1065,4595 1065,4540 1125,4480 1125,4395 1160,4360 1265,4360 1267.5,4362.5 1270,4360 1305,4360 1710,3955 1795,3955 1820,3980 1820,4180
COIL_1 on Top Layer "COIL_1_L01_P009" (solid, pour order 9): 4075,3850 4065,3860 4065,4215 4115,4265 4245,4265 4295,4215 4295,3857.5 4285,3850
COIL_2 on Top Layer "COIL_2_L01_P010" (solid, pour order 10): 4400,3850 4390,3860 4390,4215 4440,4265 4570,4265 4620,4215 4620,3857.5 4610,3850
COIL_3 on Top Layer "COIL_3_L01_P011" (solid, pour order 11): 4725,3850 4715,3860 4715,4215 4765,4265 4895,4265 4945,4215 4945,3857.5 4935,3850
+24V on Top Layer "+24V_L01_P012" (solid, pour order 12): 4110,4430 4110,4505 4120,4515 4895,4515 4900,4510 4900,4425 4890,4415 4125,4415
+24V on Top Layer "+24V_L01_P017" (solid, pour order 17): 2020,4535 2365,4535 2390,4510 2390,4290 2370,4270 2295,4270 2020,4270
GND on Top Layer "GND_L01_P037" (solid, pour order 37): 1695,3920 1715,3940 1795,3940 1815,3920 1815,3800 1845,3770 1985,3770 2160,3945 2160,4000 2185,4025 2295,4025 2310,4010 2310,3800 2165,3655 1785,3655 1695,3745
GND on Top Layer "GND_L01_P048" (solid, pour order 48): 3230,4000 3245,4015 3290,4015 3305,4000 3305,3820 3290,3805 3245,3805 3230,3820
3V3_RP2CAN on Top Layer "3V3_RP2CAN_L01_P058" (solid, pour order 58): 2580,3020 2585,3025 2625,3025 2630,3020 2630,2965 2750,2845 2750,2750 2795,2705 2840,2705 2855,2720 2855,2755 2865,2765 2930,2765 2945,2750 2945,2715 2890,2660 2770,2660 2700,2730 2700,2830 2655,2875 2600,2875 2580,2895
+5V on Top Layer "+5V_L01_P057" (solid, pour order 57): 2780,2890 2795,2875 2830,2875 2845,2890 2845,2955 2810,2990 2780,2990
+12V on Top Layer "+12V_L01_P056" (solid, pour order 56): 1440,2475 1410,2505 1410,2765 1425,2780 1595,2780 1595,2790 1635,2830 1805,2830 1825,2810 1825,2500 1800,2475
+5V on Top Layer "+5V_L01_P051" (solid, pour order 51): 3460,2960 3470,2960 3485,2945 3545,2945 3545,2995 3540,3000 3460,3000
+5V on Top Layer "+5V_L01_P042" (solid, pour order 42): 4985,335 4980,340 4980,365 4985,370 5040,370 5055,385 5065,385 5095,355 5075,335
GND on Top Layer "GND_L01_P040" (solid, pour order 40): 4765,70 4790,45 5145,45 5170,70 5170,205 5150,225 5010,225 5000,215 5000,160 4985,145 4900,145 4885,160 4885,210 4870,225 4785,225 4765,205
GND on Top Layer "GND_L01_P038" (solid, pour order 38): 4240,2540 4275,2575 4780,2575 4810,2545 4810,2340 4780,2310 4265,2310 4240,2335
+12V on Top Layer "+12V_L01_P022" (solid, pour order 22): 4795,2960 4795,2915 4810,2900 4865,2900 4875,2890 4875,2840 4835,2800 4510,2800 4460,2750 4460,2610 4490,2580 4930,2580 4955,2605 4955,2965 4940,2980 4815,2980
NetQ1_1 on Top Layer "NETQ1_1_L01_P028" (solid, pour order 28): 767.27,2812.73 775,2805 775,2760 790,2745 825,2745 840,2760 840,2805 1090,2805 1100,2795 1100,2700 1075,2675 390,2675 365,2700 365,2795 382.73,2812.73
3V3_RP2CAN on Top Layer "3V3_RP2040" (solid, pour order 25): 4907.79,2078.54 4907.79,658.54 3987.79,658.54 3987.79,2078.54
NetC6_1 on Top Layer "NETC6_1_L01_P021" (solid, pour order 21): 4505,2845 4510,2850 4675,2850 4770,2850 4815,2895 4870,2895 4875,2890 4875,2820 4830,2775 4705,2775 4650,2830 4510,2830 4505,2835
NetC6_2 on Top Layer "NETC6_2_L01_P020" (solid, pour order 20): 4505,2870 4510,2875 4715,2875 4730,2890 4735,2895 4785,2895 4790,2890 4790,2820 4785,2815 4725,2815 4725,2820 4690,2855 4510,2855 4505,2860
NetC2_1 on Top Layer "NETC2_1_L01_P019" (solid, pour order 19): 4505,2920 4510,2925 4715,2925 4730,2940 4730,2975 4735,2980 4785,2980 4790,2975 4790,2915 4780,2905 4510,2905 4505,2910
NetR6_2 on Top Layer "NETR6_2_L01_P000" (solid, pour order 0): 4245,2650 4255,2640 4375,2640 4385,2650 4385,2790 4375,2800 4255,2800 4245,2790
NetR1_2 on Top Layer "NETR1_2_L01_P008" (solid, pour order 8): 4505,2950 4510,2955 4590,2955 4595,2960 4595,3045 4600,3050 4635,3050 4640,3045 4640,2960 4610,2930 4510,2930 4505,2935
+12V on Middle 2 Layer "+12V_L03_P027" (solid, pour order 27): 1800,2465 1835,2500 1835,2910 2000,3075 2260,3075 2405,2930 3965.04,2930 5213.66,1715 6475,1715 6600,1840 6600,3375 6481.94,3493.06 4175.08,3493.06 2250,3493.06 2018.47,3493.06 1410,2890.37 1410,2505 1450,2465
+24V on Middle 2 Layer "+24V_L03_P018" (solid, pour order 18): 5010,3615 2100,3615 1145,2660 1145,770 1065,690 400,690 330,760 330,3055 1870,4595 2405,4595 5010,4595 5050,4555 5050,3655
GND on Middle 1 Layer "GND" (solid, pour order 45): 0,250 0,4750 cw(c250,4750) 250,5000 6750,5000 cw(c6750,4750) 7000,4750 7000,250 cw(c6750,250) 6750,0 250,0 cw(c250,250)

## Keep-outs
Middle 1 Layer:
  lines w20: 950,580 950,2575 ; 1520,3880 1520,3430 1545,3405 1620,3405 5020,3405 5070,3455 5070,4630 5045,4655 1570,4655 1520,4605 1520,4230
Keep-Out Layer:
  region: 6750,500 ccw(c6750,250) 6500,250 6500,0 6750,0 ccw(c6750,250) 7000,250 7000,500
  region: 7000,4750 ccw(c6750,4750) 6750,5000 6500,5000 6500,4750 ccw(c6750,4750) 6750,4500 7000,4500
  region: 250,4500 ccw(c250,4750) 500,4750 500,5000 250,5000 ccw(c250,4750) 0,4750 0,4500
  region: 0,250 ccw(c250,250) 250,0 500,0 500,250 ccw(c250,250) 250,500 0,500
  lines w10: 0,500 0,250 ; 500,0 250,0 ; 0,250 ccw(c250,250) 250,0 ; 0,250 0,4750 cw(c250,4750) 250,5000 6750,5000 cw(c6750,4750) 7000,4750 7000,250 cw(c6750,250) 6750,0 250,0

## Other copper
Top Layer:
  pour cut-out: 4282.14,1625.22 4282.36,1625 4499.11,1625 4499.11,1677.61 4471.79,1704.93 4399.17,1704.93 4384.11,1720 4284.11,1720
  pour cut-out: 4279.11,1335.31 4279.07,1335.28 4258.67,1335.28 4258.67,1110.55 4271.31,1123.19 4275.96,1123.19 4275.96,1158.75 4300.02,1182.81 4300.02,1204.98 4285,1220 4285,1230
  pour cut-out: 4389.23,1535 4339.23,1485 4294.23,1485 4294.23,1575 4329.23,1575
  pour cut-out: 4519.69,827 4508.94,831.06 4476.06,831.06 4470,825 4470,795 4495,795 4505,805
  pour cut-out: 4905,1195 4905,1405 4900,1410 4650,1410 4650,1270 4710,1180

## Silkscreen, mask and mechanical layers (free items; w line width, h text height)
Top Overlay:
  drawing of 177 lines, arcs and shapes, not listed
  text "Capacitor Bleed" at 1715,4669.99 h60
  text "Torpedo Rails" at 2940,4669.99 h60
  text "Torpedo Coils" at 4125,4669.99 h60
  text "CANL" at 800,4035 h30
  text "GND" at 1000,4035 h30
  text "V+" at 1225,4035 h30
  text "CANH" at 800,3935 h30
  text "+5V" at 1000,3935 h30
  text "+15V" at 1200,3935 h30
  text "V+  24V Converter" at 255,3735 h60
  text "PASSIVE BLEED" at 1715,3540 h40
  text "ACTIVE BLEED" at 1715,3440 h40
  text "15V  12V Converter" at 1385,3180 h60
  text "LvL Shifter" at 2520,3175 h50
  text "LDO" at 3355,3175 h60
  text "Motor Driver" at 4145,3135 h60
  text "Marker / Droppers" at 5115.07,3095 h60
  text "COIL1" at 5705,2913.39 h30
  text "TORP1" at 5905,2913.39 h30
  text "COIL2" at 5705,2748.03 h30
  text "NC" at 5905,2748.03 h30
  text "COIL3" at 5705,2582.68 h30
  text "TORP2" at 5905,2582.68 h30
  text "DROP1" at 5705,2417.32 h30
  text "+12V" at 5905,2417.32 h30
  text "DROP2" at 5705,2251.97 h30
  text "+12V" at 5905,2251.97 h30
  text "Microcontroller" at 4060,2165 h60
  text "ACT+" at 5705,2086.61 h30
  text "PWM" at 5905,2086.62 h30
  text "MAG" at 5165,2010 h60
  text "SVO" at 5430,2010 h60
  text "ACT-" at 5705,1921.26 h30
  text "CHECK" at 5905,1921.26 h30
  text "ENSURE CLAW / OUTPUT IS IN / CORRECT STATE" at 5107.59,1445 h30
  text "BOOT" at 4060.01,1066.62 h40 r270
  text "GND" at 5515,935 h30 r90
  text "+5V" at 6415,910 h30 r90
  text "TORP_SEL1" at 5810,860 h30 r90
  text "MARKER_2" at 6010,860 h30 r90
  text "RESET" at 4060.01,851.61 h40 r270
  text "MOTOR_SLEEP" at 5610,835 h30 r90
  text "MOTOR_FAULT" at 5710,835 h30 r90
  text "TORP_COIL3" at 6110,835 h30 r90
  text "TORP_COIL1" at 6210,835 h30 r90
  text "ACT_PWM_3.3V" at 5910,810 h30 r90
  text "MOTOR_VPROPI" at 6310,810 h30 r90
  text "TERM / ON" at 4700,658.31 h40 r270
  text "GND" at 5515,560 h30 r90
  text "V_DIV" at 6310,535 h30 r90
  text "DRAIN" at 5915,510 h30 r90
  text "MARKER_1" at 6110,485 h30 r90
  text "MOTOR_EN" at 5610,460 h30 r90
  text "TORP_SEL2" at 5810,460 h30 r90
  text "TORP_ARM" at 6010,460 h30 r90
  text "TORP_COIL2" at 6210,460 h30 r90
  text "MOTOR_PHASE" at 5710,435 h30 r90
  text "3V3_RP2CAN" at 6410,435 h30 r90
  text "+5V" at 905,360 h30
  text "MOTOR ENABLED" at 1135,360 h40
  text "RGB" at 905,260 h30
  text "V+ CONNECTED" at 1135,260 h40
  text "The Underwater Robotics Team" at 2985,235 h60
  text "GND" at 905,160 h30
  text "TORPEDO CHARGING" at 1125,150 h40
  text "'.ProjectTitle'" at 2985,110 h60
  text "v'.BoardRevision'" at 4415.06,110 h60
Bottom Overlay:
  region: 2381 vertices and 36 holes, not listed, extent 6377.02,4860.59 6417.95,4944.6

## Text inside footprints (layer, text, board x,y; h text height)
DEBUG_CONN: Top Overlay "1" at 6469,266 h35 r180
U2: Top Overlay "*" at 278.5,3140 h50; Mechanical 13 "*" at 328.5,3140 h50
U3: Top Overlay "*" at 1684.5,3087.5 h50 r270; Mechanical 13 "*" at 1839.5,3012.5 h50 r270